# Altium PCB esp32p10displayPCB1.PcbDoc (part 3 of 3)
Units mil, origin at the board's own origin, x right, y up, seen from the top; angles counter-clockwise.
Board outline 3760 x 6044 mil, 2 copper layers (Top Layer, Bottom Layer); 134 components, 104 nets, 470 pads, 215 vias.
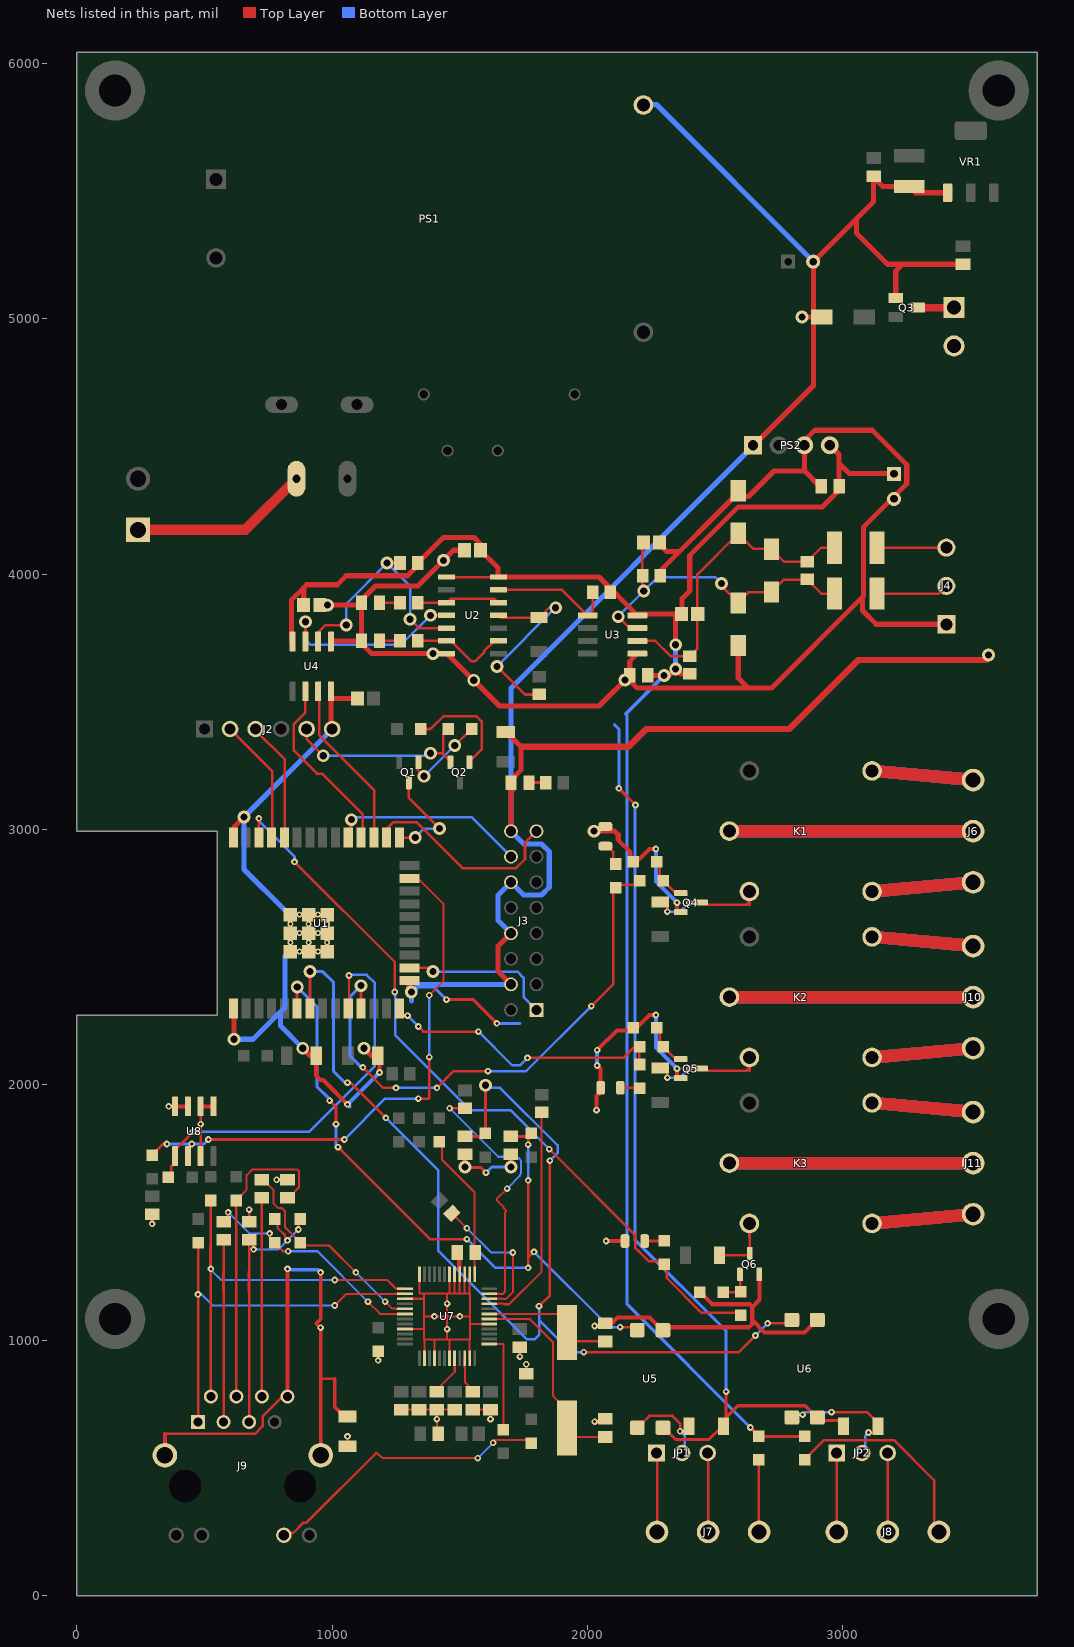
[diagram p2: the nets of this part, all layers, seen from the top]

## Via types
v1: diameter 26, hole 12, Top Layer to Bottom Layer, tented both sides, 166 vias
v2: diameter 50, hole 28, Top Layer to Bottom Layer, tented both sides, 49 vias

## Nets (pads, with @x,y where several pads share a name; then routed paths per layer and width w, separated by ;. In a path a pad name is that pad's centre, name@x,y a point inside that pad or via, vN(x,y) a via of type N, cw(c..) or ccw(c..) an arc to the next point about the centre after c; other vN are vias at no path point) (continued)
ETH_LED_Y: J9.11 R30.2 | length 1113
  Top Layer w8: 1172.5,559 1197.5,539 v1(1570,539) ; v1(1630,599) 1640,609 R30.2@1770,609
  Top Layer w10: J9.11@822.5,246.5 847.5,246.5 887.5,286.5 900,286.5 1172.5,559
  Bottom Layer w8: v1(1570,539) v1(1630,599)
ETH_LINK: R29.1 U7.25 | length 390.9
  Top Layer w8: U7.25@1614.57,985.73 1650.28,985.73 1670,985.73 R29.1@1670,650.26
ETH_MISO: R40.2 U7.34 | length 562.9
  Top Layer w7: 1662.5,1164 1665,1161.5 1680,1161.5
  Top Layer w7.5: 1650,1164 1662.5,1164
  Top Layer w8: R40.2@1468.89,1497.61 v1(1527.5,1439) ; U7.34@1614.57,1162.9 1650.28,1162.9 ; 1680,1161.5 1707.5,1189 v1(1707.5,1344)
  Bottom Layer w8: v1(1527.5,1439) 1622.5,1344 v1(1707.5,1344)
ETH_MOSI: R41.2 U7.35 | length 1056.1
  Top Layer w7: 1650,1181.5 1667.5,1181.5
  Top Layer w8: v1(1460,1909) R41.2@1520,1909 ; U7.35@1614.57,1182.58 1650.28,1182.58 ; 1667.5,1181.5 1677.5,1191.5 1677.5,1501.5 ; 1680,1504 1680,1509 1670,1519 1670,1524 1645,1549 1645,1554 v1(1685,1594)
  Bottom Layer w8: v1(1460,1909) 1650,1719 1720,1719 1725,1714 1730,1714 1740,1704 1740,1654 1735,1649 1735,1644 v1(1685,1594)
ETH_RCT: C29.1 J9.5 R26.2 R27.2 | length 1226.6
  Top Layer w8: 672.5,1191.5 672.5,1269 ; 675,1309 C29.1@675,1384 ; C29.1@690,1384 690,1359 v1(692.5,1356.5) ; R26.2@785,1464 785,1441.5 805,1421.5 807.5,1421.5 807.5,1419 810,1419 810,1416.5 812.5,1416.5 812.5,1414 815,1414 815,1401.5 v1(825,1391.5) ; v1(867.5,1434) R27.2@867.5,1464
  Top Layer w10: J9.5@674.8,680 674.8,1180 C29.1@674.8,1393.57
  Bottom Layer w8: v1(692.5,1356.5) 790,1356.5 v1(825,1391.5) v1(867.5,1434)
ETH_RDN: C31.1 J9.6 | length 931.1
  Top Layer w8: 722.5,1291.5 722.5,1369 ; 725,1474 C31.1@725,1549
  Top Layer w10: J9.6@724.8,780 724.8,1280 C31.1@724.8,1558.57
ETH_RDP: C30.1 J9.3 | length 866.1
  Top Layer w8: 572.5,1191.5 572.5,1269 ; 575,1309 C30.1@575,1384
  Top Layer w10: J9.3@574.8,680 574.8,1180 C30.1@574.8,1393.57
ETH_RST: C35.1 R22.1 U7.37 | length 561
  Top Layer w8: R22.1@1430,1766.5 1430,1706.5 1557.5,1579 1557.5,1294 ; U7.37@1558.27,1258.57 1558.27,1294.28
ETH_RXN: C31.2 R27.1 U7.5 | length 788.8
  Top Layer w8: C31.2@740,1619 770,1589 770,1536.5 787.5,1519 802.5,1519 815,1506.5 815,1444 R27.1@865,1394 ; R27.1@885,1371.5 987.5,1371.5 v1(1092.5,1266.5) ; v1(1207.5,1151.5) 1235,1124 1250,1124 ; 1249.72,1123.53 U7.5@1285.43,1123.53
  Bottom Layer w8: v1(1092.5,1266.5) v1(1207.5,1151.5)
ETH_RXP: C30.2 R26.1 U7.6 | length 865.9
  Top Layer w8: C30.2@590,1474 590,1499 v1(592.5,1501.5) ; v1(755,1419) 755,1404 R26.1@765,1394 ; R26.1@785,1371.5 807.5,1349 v1(827.5,1349) ; v1(1140,1151.5) 1187.5,1104 1250,1104 ; 1249.72,1103.84 U7.6@1285.43,1103.84
  Bottom Layer w8: v1(592.5,1501.5) 675,1419 v1(755,1419) ; v1(827.5,1349) 942.5,1349 v1(1140,1151.5)
ETH_SCLK: R39.2 U7.33 | length 884.2
  Top Layer w7: 1650,1144 1670,1144 1672.5,1141.5
  Top Layer w8: U7.33@1614.57,1143.21 1650.28,1143.21 ; 1672.5,1141.5 1692.5,1141.5 1820,1269 R39.2@1820,1893.65
ETH_TCT: C28.1 J9.4 R28.1 | length 1340
  Top Layer w8: 622.5,1291.5 622.5,1369 ; 625,1464 R28.1@625,1536.5 ; R28.1@635,1559 665,1589 665,1646.5 687.5,1669 862.5,1669 870,1661.5 870,1599 C28.1@840,1569
  Top Layer w10: J9.4@624.8,780 624.8,1280 R28.1@624.8,1547.74
ETH_TXN: J9.2 R25.1 U7.1 | length 1698.9
  Top Layer w8: v1@522.5,1291.5 522.5,1369 ; 525,1464 R25.1@525,1536.5 ; v1(1010,1236.5) 1215,1236.5 1250,1201.5 ; 1249.72,1202.27 U7.1@1285.43,1202.27
  Top Layer w10: J9.2@524.8,780 v1(524.8,1280) R25.1@524.8,1547.74
  Bottom Layer w8: 532.5,1269 565,1236.5 v1(1010,1236.5)
ETH_TXP: J9.1 R24.1 U7.2 | length 1688.2
  Top Layer w7.5: 1055,1181.5 1250,1181.5
  Top Layer w8: v1@475,1191.5 475,1269 ; 475,1299 R24.1@475,1371.5 ; v1(1010,1136.5) 1055,1181.5 ; 1249.72,1182.58 U7.2@1285.43,1182.58
  Top Layer w10: J9.1@474.8,680 v1(474.8,1180) R24.1@474.8,1382.74
  Bottom Layer w8: v1@487.5,1181.5 532.5,1136.5 v1(1010,1136.5)
ETH_XI: C32.1 U7.30 Y1.2 | length 669.6
  Top Layer w8: U7.30@1614.57,1084.16 1650.28,1084.16 ; 1650,1084 1772.5,1084 1865,991.5 1865,781.5 Y1.2@1902.5,744 ; Y1.2@1937.5,621.5 C32.1@2055,621.5
ETH_XO: C33.1 U7.31 Y1.1 | length 405.7
  Top Layer w8: U7.31@1614.57,1103.84 1650.28,1103.84 ; 1650,1104 Y1.1@1902.5,1104 ; Y1.1@1937.5,996.5 C33.1@2055,996.5
GND: C3.N C4.1 C5.1 C6.2 C7.2 C8.2 C9.2 C14.1 C17.2 C18.2 C19.2 C20.2 C21.2 C22.2 C23.2 C24.2 C25.2 C26.2 C27.2 C28.2 C29.2 C32.2 C33.2 C34.1 C35.2 C36.2 D7.A D8.C D10.C D14.C D16.C J2.6 J3.04 J3.08 J3.12 J3.16 J5.2 PS1.3 PS2.1 Q3.1 Q4.2 Q5.2 Q6.2 R14.1 R23.1 R32.1 R35.1 U1.1 U1.15 U1.38 U1.39_1 U1.39_2 U1.39_3 U1.39_4 U1.39_5 U1.39_6 U1.39_7 U1.39_8 U1.39_9 U1.39_10 U1.39_11 U1.39_12 U1.39_13 U1.39_14 U1.39_15 U1.39_16 U1.39_17 U1.39_18 U1.39_19 U1.39_20 U1.39_21 U4.4 U5.3 U6.3 U7.3 U7.9 U7.14 U7.16 U7.19 U7.23 U7.29 U7.38 U7.39 U7.40 U7.41 U7.42 U7.48 U8.1 U8.2 U8.3 U8.4 U8.7 VR1.1 | length 18004.7
  Top Layer w8: v1(782.5,1629) C28.2@810,1629 ; C34.1@1060,596.5 v1(1060,624) ; v1(1180,921.5) R23.1@1180,946.5 ; C19.2@1285,729 C20.2@1325,729 ; U7.9@1285.43,1044.79 1360,1044.79 ; U7.3@1285.43,1162.9 1360,1162.9 ; U7.48@1341.73,1258.57 1341.73,1184 1360,1184 ; C20.2@1355,729 C26.2@1395,729 ; 1360,1094 1540,1094 ; U7.14@1361.42,929.43 1361.42,1004 ; U7.16@1400.79,929.43 1400.79,1004 ; C23.2@1410,649 v1(1410,691.5) C26.2@1410,719 ; C26.2@1425,729 C21.2@1465,729 ; 1450,1004 1450,1184 ; U7.19@1459.84,929.43 1459.84,1004 ; 1459.84,1184 U7.42@1459.84,1258.57 ; 1479.53,1184 U7.41@1479.53,1258.57 ; 1499.21,1184 U7.40@1499.21,1258.57 ; 1518.9,1184 U7.39@1518.9,1258.57 ; U7.23@1538.58,929.43 1538.58,1004 ; 1538.58,1184 U7.38@1538.58,1258.57 ; 1540,1064.47 U7.29@1614.57,1064.47 ; C27.2@1565,729 C22.2@1605,729 ; v1(1620,691.5) C22.2@1620,719 ; v1(1735,936.5) C24.2@1735,964 ; C25.2@1760,879 v1(1760,906.5) ; 1360,1184 1360,1004 1540,1004 1540,1184 1360,1184
  Top Layer w10: U8.7@485,1721.56 U8.2@485,1916.44 ; C29.2@675,1464.43 v1(675,1512)
  Top Layer w12: v1(1447.5,2334) 1552.5,2334 v1(1645,2241.5) ; v2@1525,1676.5 1582.5,1676.5 v1(1602.5,1656.5)
  Top Layer w16: v1(295,1456.5) C36.2@295,1484 ; v1(360,1916.5) U8.4@380,1916.5 ; U8.4@390,1916.5 U8.3@430,1916.5 ; U8.2@490,1916.5 U8.1@530,1916.5 ; C7.2@947.5,2091.5 937.5,2081.5 937.5,2036.5 955,2019 965,2019 v1(1060,1924) ; v1(1185,2049) C8.2@1185,2091.5 ; U7.40@1497.5,1286.5 C35.2@1497.5,1329 ; v1(2027.5,681.5) C32.2@2055,681.5 ; v1(2027.5,1056.5) C33.2@2055,1056.5 ; v1(2035,1901.5) 2035,1956.5 D14.C@2050,1971.5 ; v1(2037.5,2076.5) 2050,2064 D14.C@2050,2006.5 ; v1(2037.5,2136.5) 2115,2214 R32.1@2167.5,2214 ; v1(2072.5,1389) D16.C@2140,1389 ; C33.2@2085,1056.5 2117.5,1089 2242.5,1089 U5.3@2280,1051.5 ; 2125,2954 2167.5,2911.5 R14.1@2167.5,2884 ; R32.1@2190,2221.5 2242.5,2274 v1(2267.5,2274) ; R14.1@2190,2871.5 2242.5,2924 v1(2267.5,2924) ; U5.3@2310,1051.5 2632.5,1051.5 2645,1064 2645,1131.5 ; Q5.2@2350,2031.5 v1(2350,2064) ; Q4.2@2350,2681.5 v1(2350,2714) ; R35.1@2450,1179 2487.5,1141.5 2635,1141.5 2645,1131.5 ; 2645,1079 2692.5,1031.5 2850,1031.5 U6.3@2885,1066.5 ; Q6.2@2672.5,1239 2672.5,1159 2645,1131.5
  Top Layer w20: U1.1@612.91,2299.35 615,2299 v2(615,2179) ; U1.38@612.91,2968.65 615,2969 615,3009 v2(655,3049) ; v2(885,2144) 915,2114 940,2114 C7.2@938.07,2114 ; U4.4@995,3514 1100,3514 C14.1@1098.5,3514 ; U4.4@995,3541.56 995,3544 995,3399 J2.6@1000,3394 ; v2(1125,2144) 1155,2114 1180,2114 C8.2@1178.07,2114 ; U1.15@1302.28,2409 1300,2409 1300,2374 v2(1310,2364) ; v2(1520,1679) C18.2@1520,1719 ; C9.2@1680,3382.07 1680,3384 1740,3324 1740,3234 1700,3194 J3.16@1700,2994 ; v2(1700,1679) C17.2@1700,1719 ; J3.04@1700,2394 1650,2444 1650,2544 J3.08@1700,2594 ; 1705,3154 D8.C@1705,3169 ; v2(2025,2994) 2105.78,2994 2120,2979.78 2120,2962.4 ; PS2.1@2648.43,4505.1 2650,4504 2885,4739 C3.N@2885,5224 ; v2(2840,5007) D7.A@2916.73,5007 ; 3053.28,5392.28 3053.28,5335.72 3175,5214 3470,5214 C5.1@3470,5213.57 ; C4.1@3120,5554 3155,5519 C6.2@3260,5519 ; C4.1@3120,5559 3120,5459 C3.N@2885,5224 ; Q3.1@3206.69,5081.4 3206.7,5187.3 3233.4,5214 ; VR1.1@3410,5494 3285,5494 C6.2@3260,5519 ; C3.N@2885,5224 C3.N@2883.43,5224 C3.N@2885,5224 ; C6.2@3260,5519 C6.2@3260,5518.37 C6.2@3260,5519
  Top Layer w25: 1740,3324 2160,3324 2230,3394 2790,3394 3060,3664 3561,3664 3570,3673 v2(3570,3684)
  Bottom Layer w12: v2@1315,2366.5 1332.5,2384 1397.5,2384 v1(1447.5,2334) ; v1(1602.5,1656.5) 1625,1679 v2@1695,1679 ; v1(1645,2241.5) 1735,2241.5
  Bottom Layer w16: v1@1067.5,1916.5 v1(1060,1924) v1(1185,2049) ; v1(2037.5,2076.5) v1(2037.5,2136.5) ; v1(2267.5,2274) 2267.5,2146.5 v1(2350,2064) ; v1(2267.5,2924) 2267.5,2796.5 v1(2350,2714)
  Bottom Layer w20: v2(615,2179) 690,2179 815,2304 815,2504 ; 798.28,2287.28 798.28,2230.72 v2(885,2144) ; 815,2684 655,2844 v2(655,3049) J2.6@1000,3394 ; 1310,2329 v2(1310,2364) 1340,2394 J3.04@1700,2394 ; J3.08@1700,2594 1650,2644 1650,2744 J3.12@1700,2794 1750,2744 1820,2744 1850,2774 1850,2914 1820,2944 1750,2944 J3.16@1700,2994 1700,3554 2650,4504 PS2.1@2648.43,4505.1 ; PS1.3@2218.23,5837.43 2220,5839 2270,5839 2885,5224 C3.N@2883.43,5224
  other v1: 1450,1044 1400,1094 1500,1094 1450,1144 485,1846.5
GPIO_0: Q1.3 U1.25 | length 401.4
  Top Layer w10: U1.25@1262.91,2968.65 1265,2969 v2(1325,2969) ; Q1.3@1300,3184.04 1300,3124 v2(1420,3004)
  Bottom Layer w10: v2(1325,2969) 1360,3004 v2(1420,3004)
I2C_SCL: R38.1 U1.23 U8.6 | length 2106.8
  Top Layer w8: U1.23@1332.5,2801.5 1342.5,2801.5 1435,2709 1435,2406.5 v1(1380,2351.5) ; 1380,1946.5 v1(1380,2109)
  Top Layer w10: R38.1@305,1736.5 337.5,1769 v1(352.5,1769) ; U8.6@435,1754 v1(450,1769) ; v1(515,1786.5) v1(1047.5,1786.5) ; v1(1337.5,1946.5) 1377.5,1946.5
  Bottom Layer w8: v1(1380,2109) v1(1380,2351.5)
  Bottom Layer w10: v1(352.5,1769) v1(450,1769) 497.5,1769 v1(515,1786.5) ; v1(1047.5,1786.5) 1207.5,1946.5 v1(1337.5,1946.5)
I2C_SDA: R37.1 U1.10 U8.5 | length 1516
  Top Layer w8: U1.10@1062.91,2299.35 1066,2329 v1(1066,2429)
  Top Layer w10: R37.1@370,1649 370,1681.5 U8.5@380,1691.5 ; U8.5@390,1751.5 v1(455,1816.5)
  Bottom Layer w10: v1(455,1816.5) 910,1816.5 1167.5,2074 1167.5,2399 1135,2431.5 v1@1077.5,2431.5
IN1: C17.1 R18.1 U1.6 U5.4 | length 2823
  Top Layer w10: v1(990,1939) 1015,1914 v1(1015,1846.5) ; v1(1022.5,1756.5) 1382.5,1396.5 v1(1527.5,1396.5) ; v1(1767.5,1284) v1(1767.5,1626.5) ; 1767.5,1324 v1(1790,1346.5) ; v1(1767.5,1766.5) R18.1@1767.5,1794 ; v1(2127.5,1051.5) U5.4@2180,1051.5
  Top Layer w12: U1.6@862.91,2299.35 v2(862.9,2384) ; C17.1@1715,1799 R18.1@1770,1799
  Bottom Layer w10: v1(1015,1846.5) 1015,1764 v1(1022.5,1756.5) ; v1(1527.5,1396.5) 1640,1284 v1(1767.5,1284) ; v1(1767.5,1626.5) v1(1767.5,1766.5) ; v1(1790,1346.5) 2085,1051.5 v1(2127.5,1051.5)
  Bottom Layer w12: v2(862.9,2384) 940,2307 940,1994 v1@990,1944
IN1_COM: J7.3 R16.1 | length 250
  Top Layer w10: J7.3@2670,271.5 R16.1@2670,521.5
IN1_NC: J7.2 JP1.3 | length 272.5
  Top Layer w10: J7.2@2472.5,271.5 JP1.3@2472.5,544
IN1_NO: J7.1 JP1.1 | length 272.5
  Top Layer w10: J7.1@2272.5,271.5 JP1.1@2272.5,544
IN1_SIG: D11.C JP1.2 U5.1 | length 313.1
  Top Layer w10: U5.1@2210,671.5 2242.5,704 2332.5,704 2362.5,674 v1(2362.5,644) D11.C@2387.5,644
  Bottom Layer w10: v1(2362.5,644) 2380,626.5 JP1.2@2380,571.5
IN2: C18.1 R19.1 U1.7 U6.4 | length 4467.8
  Top Layer w10: v1(1060,2009) 1072.5,2009 v1(1210,1871.5) ; v1(1810,1134) 1852.5,1176.5 v1(1852.5,1704) ; v1(1985,954) 2592.5,954 v1(2657.5,1019) ; v1(2705,1066.5) U6.4@2785,1066.5
  Top Layer w12: U1.7@912.91,2299.35 v2(912.9,2444) ; C18.1@1535,1799 R19.1@1590,1799 ; R19.1@1600,1819 v2(1600,1999)
  Bottom Layer w10: v1@1057.5,2009 v1(1060,2009) ; v1(1210,1871.5) 1415,1666.5 1415,1351.5 1762.5,1004 1792.5,1004 1810,1021.5 v1(1810,1134) ; v2@1622.5,1989 1657.5,1989 1882.5,1764 1882.5,1734 v1(1852.5,1704) ; 1810,1079 1935,954 v1(1985,954) ; v1(2657.5,1019) v1(2705,1066.5)
  Bottom Layer w12: v2(912.9,2444) 963.56,2444 1005,2402.55 1005,2054 v1@1055,2004
IN2_COM: J8.3 R17.1 | length 779.7
  Top Layer w10: R17.1@2860,544 2925,609 3200,609 3357.5,451.5 J8.3@3357.5,261.5
IN2_NC: J8.2 JP2.3 | length 272.5
  Top Layer w10: J8.2@3175,271.5 JP2.3@3175,544
IN2_NO: J8.1 JP2.1 | length 272.5
  Top Layer w10: J8.1@2975,271.5 JP2.1@2975,544
IN2_SIG: D12.C JP2.2 U6.1 | length 433.8
  Top Layer w10: U6.1@2815,709 v1(2842.5,709) ; v1(2955,719) 3095,719 D12.C@3127.5,686.5 ; v1(3100,639) 3125,639 D12.C@3127.5,641.5
  Bottom Layer w10: v1(2842.5,709) 2852.5,719 v1(2955,719) ; JP2.2@3087.5,569 3087.5,626.5 v1(3100,639)
ISO_5V: C1.P C2.2 C10.1 C11.2 C12.2 C15.2 PS2.4 R5.2 R6.2 R11.1 R16.2 R17.2 U2.1 U2.14 U3.8 U4.8 | length 7419
  Top Layer w10: U2.1@1448,3989 U2.14@1652,3989
  Top Layer w12: v1(2637.5,659) R16.2@2660,636.5 ; R16.2@2680,624 R17.2@2840,624
  Top Layer w20: U4.8@845,3736.44 845,3734 840,3739 840,3899 855,3914 900,3959 1020,3959 1055,3994 1295,3994 1335,4034 R6.2@1335,4044 ; C15.2@888.5,3879 888.5,3947.5 ; R11.1@2089.45,3929 R11.1@2097.2,3936.8 ; U3.8@2190,3844 C11.2@2370,3844 ; U3.8@2195,3839 2045,3989 U2.14@1650,3989 ; C10.1@2235.43,3604 2235,3604 2320,3604 v2(2345,3629) 2365,3609 2400,3609 R5.2@2400,3609.55 ; v2(2345,3724) C11.2@2345,3844 ; PS2.4@2948.43,4505.1 2950,4504 2985,4469 C2.2@2985,4344 ; 2985,4434 3025,4394 3200,4394 C1.P@3200,4393.21 ; R6.2@1335,4044 1435,4144 1555,4144 1580,4119 C12.2@1580,4094 ; R6.2@1335,4044 R6.2@1334.45,4044 R6.2@1335,4044 ; C12.2@1580,4094 1650,4024 U2.14@1650,3989 ; C12.2@1580,4094 C12.2@1581.5,4094 C12.2@1580,4094 ; U2.14@1650,3989 U2.14@1652,3989 U2.14@1650,3989 ; C11.2@2370,3844 2370,3904 2400,3934 2400,4074 2590,4264 2920,4264 2985,4329 C2.2@2985,4344 ; C11.2@2370,3844 C11.2@2368.5,3844 C11.2@2370,3844 ; C2.2@2985,4344 C2.2@2985.43,4344 C2.2@2985,4344
  Bottom Layer w12: 2155,3449 2155,1141.5 v1(2637.5,659)
  Bottom Layer w15: 2150,3454 v2(2300,3604)
  Bottom Layer w20: v2(2345,3629) v2(2345,3724)
ISO_GND: C1.N C2.1 C10.2 C12.1 C13.1 C15.1 D1.C D2.C D3.2 D6.1 D11.A D12.A J4.1 PS2.3 R9.1 U2.7 U3.5 U4.5 U5.2 U6.2 | length 9674.9
  Top Layer w12: v1(2122.5,3161.5) v1(2187.5,3096.5) ; U5.2@2310,646.5 2345,611.5 2475,611.5 D11.A@2522.5,659 ; D11.A@2542.5,686.5 v1(2542.5,799) ; 2542.5,699 2587.5,744 2852.5,744 U6.2@2885,711.5 ; U6.2@2915,686.5 D12.A@2992.5,686.5
  Top Layer w20: C15.1@951.5,3879 D2.C@1100,3879 ; U4.5@995,3736.44 995,3734 1000,3739 D1.C@1115,3739 ; D1.C@1105,3739 1155,3689 U2.7@1450,3689 ; C12.1@1518.5,4094 1520,4094 1475,4094 1335,3954 1170,3954 1115,3899 D2.C@1115,3889 ; C10.2@2155,3594 2195,3554 2720,3554 3080,3914 3080,4184 3250,4354 3250,4429 3115,4564 2890,4564 2850,4524 2850,4404 ; U3.5@2195,3689 2165,3659 C10.2@2165,3604 ; C13.1@2281.5,4124 2280,4124 2280,4119 2310.25,4088.75 2359.75,4088.75 ; R9.1@2284.45,3994 2285,3994 2285,4014 2575,4304 2630,4304 2730,4404 2850,4404 ; D6.1@2590,3720.73 2590,3719 2590,3594 2630,3554 ; D3.2@2590,4304 2590,4329 D3.2@2590,4327.27 ; PS2.3@2848.43,4505.1 PS2.3@2850,4504 ; C2.1@2914.57,4344 2915,4344 2910,4344 2850,4404 ; 3076.46,3910.46 3076.46,3857.54 3130,3804 J4.1@3405,3804 ; C1.N@3195,4299 3200,4294 C1.N@3200,4294.79 ; D1.C@1115,3739 D2.C@1115,3889 ; D1.C@1115,3739 D1.C@1114.57,3739 D1.C@1115,3739 ; D2.C@1115,3889 D2.C@1114.57,3889 D2.C@1115,3889 ; U2.7@1450,3689 1655,3484 2045,3484 C10.2@2165,3604 ; U2.7@1450,3689 U2.7@1448,3689 U2.7@1450,3689 ; C10.2@2165,3604 C10.2@2164.57,3604 C10.2@2165,3604
  Bottom Layer w12: 2105,3411.5 2122.5,3394 v1(2122.5,3161.5) ; v1(2187.5,3096.5) 2185,3094 2185,1394 2542.5,1036.5 v1(2542.5,799)
  other v2: 1554.3,3584.7 2146.8,3585.8 1395,3689 982.2,3879 1435.5,4054.5
ISO_RX: U2.4 U4.7 | length 762.9
  Top Layer w10: U4.7@895,3734 U4.7@895,3736.44 v2(895,3814) ; v2(1385,3839) 1450,3839 U2.4@1448,3839
  Bottom Layer w10: v2(895,3814) 895,3744 915,3724 1270,3724 v2(1385,3839)
ISO_TX: R6.1 U2.5 U4.6 | length 943.6
  Top Layer w10: U4.6@945,3734 U4.6@945,3736.44 945,3771.95 974.05,3801 v2(1055,3801) ; v2@1210,4044 v2(1215,4044) 1265,4044 R6.1@1265.55,4044 ; v2(1305,3824) 1340,3789 1450,3789 U2.5@1448,3789
  Bottom Layer w10: v2(1055,3801) 1055,3884 v2(1215,4044) 1305,3954 v2(1305,3824)
NetC11_1: C11.1 D3.1 D4.2 F1.1 R5.1 R7.2 U3.6 | length 1246.3
  Top Layer w10: U3.6@2195,3739 2265,3739 2325,3679 R5.1@2400,3679 ; F1.1@2967.32,4104 2965,4104 2915,4104 R7.2@2860,4049 ; R5.1@2400,3679 2430,3709 C11.1@2430,3844 ; R5.1@2400,3679 R5.1@2400,3678.45 R5.1@2400,3679 ; C11.1@2430,3844 2430,3999 D3.1@2590,4159 ; C11.1@2430,3844 C11.1@2431.5,3844 C11.1@2430,3844 ; D3.1@2590,4159 2650,4099 D4.2@2720,4099 ; D3.1@2590,4159 D3.1@2590,4160.73 D3.1@2590,4159 ; D4.2@2720,4099 2770,4049 R7.2@2860,4049 ; D4.2@2720,4099 D4.2@2720,4097.27 D4.2@2720,4099 ; R7.2@2860,4049 R7.2@2860,4048.45 R7.2@2860,4049
NetC13_2: C13.2 D4.1 D6.2 F2.1 R7.1 R9.2 U3.7 | length 1317.3
  Top Layer w10: v2(2120,3834) 2165,3789 U3.7@2195,3789 ; C13.2@2218.5,4124 2220,4124 2215,4119 R9.2@2215,3994 ; v2(2220,3934) 2215,3939 R9.2@2215,3994 ; v2(2525,3964) 2525,3954 D6.2@2590,3889 ; F2.1@2967.32,3924 2965,3924 2915,3924 R7.1@2860,3979 ; R9.2@2215,3994 R9.2@2215.55,3994 R9.2@2215,3994 ; D6.2@2590,3889 2630,3929 D4.1@2720,3929 ; D6.2@2590,3889 D6.2@2590,3887.27 D6.2@2590,3889 ; D4.1@2720,3929 2770,3979 R7.1@2860,3979 ; D4.1@2720,3929 D4.1@2720,3930.73 D4.1@2720,3929 ; R7.1@2860,3979 R7.1@2860,3979.55 R7.1@2860,3979
  Bottom Layer w10: v2(2120,3834) v2(2220,3934) 2275,3989 2500,3989 v2(2525,3964)
NetC26_1: C26.1 U7.20 | length 143.5
  Top Layer w8: C26.1@1425,809 1425,821.5 1480,876.5 1480,894 ; 1479.53,893.72 U7.20@1479.53,929.43
NetC27_1: C27.1 U7.22 | length 126.9
  Top Layer w7.5: 1520,836.5 1520,894
  Top Layer w8: 1518.9,893.72 U7.22@1518.9,929.43 ; 1520,836.5 1535,821.5 C27.1@1535,809
NetD1_A: D1.A R4.2 | length 81
  Top Layer w10: D1.A@1185.43,3739 1185,3739 1265,3739 R4.2@1265.55,3739
NetD2_A: D2.A R10.2 | length 81
  Top Layer w10: D2.A@1185.43,3889 1185,3889 1265,3889 R10.2@1265.55,3889
NetD5_A: D5.A R8.1 U2.11 | length 788.3
  Top Layer w10: v2(1645,3639) 1755,3529 1810,3529 R8.1@1810,3529.55 ; U2.11@1652,3839 1650,3839 1660,3829 D5.A@1810,3829 ; v2(1875,3869) 1850,3869 D5.A@1810,3829 ; D5.A@1810,3829 D5.A@1810,3831.13 D5.A@1810,3829
  Bottom Layer w10: v2(1645,3639) v2(1875,3869)
NetD8_A: D8.A R12.2 | length 40
  Top Layer w12: D8.A@1785,3184 R12.2@1825,3184
NetD9_A: D9.A K1.COIL2 Q4.3 | length 381.6
  Top Layer w10: D9.A@2307.5,2706.5 2312.5,2701.5 v1(2312.5,2679) ; v1(2397.5,2714) Q4.3@2425,2714 ; Q4.3@2465,2714 2472.5,2706.5 2622.5,2706.5 2630,2714
  Top Layer w12: 2634,2704 K1.COIL2@2634,2757.8
  Bottom Layer w10: v1(2312.5,2679) 2362.5,2679 v1(2397.5,2714)
NetD10_A: D10.A R15.1 | length 58.7
  Top Layer w10: D10.A@2085,2929 2100,2914 R15.1@2100,2876.5
NetD13_A: D13.A K2.COIL2 Q5.3 | length 381.6
  Top Layer w10: D13.A@2307.5,2056.5 2312.5,2051.5 v1(2312.5,2029) ; v1(2397.5,2064) Q5.3@2425,2064 ; Q5.3@2465,2064 2472.5,2056.5 2622.5,2056.5 2630,2064
  Top Layer w12: 2634,2054 K2.COIL2@2634,2107.8
  Bottom Layer w10: v1(2312.5,2029) 2362.5,2029 v1(2397.5,2064)
NetD14_A: D14.A R33.1 | length 60
  Top Layer w10: D14.A@2135,1989 R33.1@2195,1989
NetD15_A: D15.A K3.COIL2 Q6.3 | length 196.3
  Top Layer w10: D15.A@2527.5,1334 Q6.3@2630,1334 ; Q6.3@2635,1359 2635,1399
  Top Layer w12: 2634,1404 K3.COIL2@2634,1457.8
NetD16_A: D16.A R36.1 | length 60
  Top Layer w10: D16.A@2230,1389 R36.1@2290,1389
NetF1_2: F1.2 J4.3 | length 272.3
  Top Layer w10: F1.2@3132.68,4104 3135,4104 J4.3@3405,4104
NetF2_2: F2.2 J4.2 | length 284.7
  Top Layer w10: F2.2@3132.68,3924 3135,3924 3375,3924 J4.2@3405,3954
NetF3_1: F3.1 J1.1 | length 702.8
  Top Layer w40: J1.1@240,4174 540,4174 660,4174 F3.1@860,4374
NetJ5_1: J5.1 Q3.3 | length 141.7
  Top Layer w30: Q3.3@3293.31,5044 J5.1@3435,5044
NetQ1_1: Q1.1 R3.2 | length 330.6
  Top Layer w10: Q1.1@1337.4,3263.96 1335,3264 1335,3234 v2(1360,3209) ; v2(1480,3329) 1545,3394 R3.2@1546.26,3394
  Bottom Layer w10: v2(1360,3209) v2(1480,3329)
NetQ2_1: Q2.1 R2.2 | length 453.4
  Top Layer w10: R2.2@1346.26,3394 1345,3394 1385,3394 1435,3444 1565,3444 1585,3424 1585,3314 1535,3264 Q2.1@1537.4,3263.96
NetQ4_1: Q4.1 R13.2 R14.2 | length 109.1
  Top Layer w10: R14.2@2282.5,2864 2282.5,2811.5 R13.2@2285,2809 ; R13.2@2307.5,2789 Q4.1@2345,2751.5
NetQ5_1: Q5.1 R31.2 R32.2 | length 109.1
  Top Layer w10: R32.2@2282.5,2214 2282.5,2161.5 R31.2@2285,2159 ; R31.2@2307.5,2139 Q5.1@2345,2101.5
NetQ6_1: Q6.1 R34.2 R35.2 | length 85
  Top Layer w10: R35.2@2542.5,1189 R34.2@2590,1189 ; R34.2@2597.5,1201.5 Q6.1@2597.5,1239
NetR4_1: R4.1 U2.6 U2.9 | length 390.8
  Top Layer w10: R4.1@1334.45,3739 1335,3739 U2.6@1450,3739 ; U2.9@1652,3739 1650,3739 1635,3739 1595,3699 1595,3694 1560,3659 1545,3659 1465,3739 U2.6@1450,3739 ; U2.6@1450,3739 U2.6@1448,3739 U2.6@1450,3739
NetR10_1: R10.1 U2.3 U2.12 | length 334
  Top Layer w10: R10.1@1334.45,3889 1335,3889 U2.3@1450,3889 ; U2.12@1652,3889 1650,3889 1635,3904 1465,3904 U2.3@1450,3889 ; U2.3@1450,3889 U2.3@1448,3889 U2.3@1450,3889
OE: J3.15 U1.26 | length 805.2
  Top Layer w10: U1.26@1212.91,2968.65 1215,2969 1215,3004 1240,3029 1330,3029 1510,2849 1720,2849 1755,2884 1755,2949 J3.15@1800,2994
R1: J3.01 U1.16 | length 610
  Top Layer w10: U1.16@1302.28,2459 1380,2459 v2(1395,2444)
  Bottom Layer w10: v2(1395,2444) 1725,2444 1750,2419 1750,2344 J3.01@1800,2294
RELAY: R13.1 R15.2 U1.11 | length 2076
  Top Layer w10: v1(1120,2069) 1200,1989 v1(1250,1989) ; v1(1410,1989) 1475,2054 v1(1610,2054) ; v1(2015,2309) 2100,2394 R15.2@2100,2761.5 ; R15.2@2120,2784 2187.5,2784 R13.1@2192.5,2789
  Top Layer w12: U1.11@1112.91,2299.35 v2(1112.9,2389)
  Bottom Layer w10: v1(1250,1989) v1(1410,1989) ; v1(1610,2054) 1760,2054 v1(2015,2309)
  Bottom Layer w12: v2(1112.9,2389) 1070,2346 1070,2114 v1@1120,2064
RELAY2: R31.1 R33.2 U1.14 | length 1084.9
  Top Layer w10: U1.14@1270,2271.5 v1(1295,2271.5) ; v1(1337.5,2229) 1357.5,2209 v1(1572.5,2209) ; v1(1765,2106.5) 2140,2106.5 R31.1@2192.5,2159 ; R33.2@2202.5,2091.5 R31.1@2202.5,2139
  Bottom Layer w10: v1(1295,2271.5) v1(1337.5,2229) ; v1(1572.5,2209) 1705,2076.5 1735,2076.5 v1(1765,2106.5)
RELAY3: R34.1 R36.2 U1.36 | length 2949.3
  Top Layer w10: U1.36@712.91,2968.65 v1(712.91,3044) ; v1(852.5,2874) 1245,2481.5 v1(1245,2364) ; v1(1850,1749) 2187.5,1411.5 2187.5,1361.5 2240,1309 R36.2@2290,1309 ; R36.2@2310,1286.5 2310,1244 2445,1109 R34.1@2590,1109
  Bottom Layer w10: v1(712.91,3044) 715,3031.5 852.5,2894 v1(852.5,2874) ; v1@1247.5,2351.5 1247.5,2194 1540,1901.5 1697.5,1901.5 v1(1850,1749)
RLY2_COM: J10.2 K2.COM | length 1910
  Top Layer w50: K2.COM@2555.04,2344 J10.2@3510,2344
  Bottom Layer w50: K2.COM@2555.04,2344 J10.2@3510,2344
RLY2_NC: J10.3 K2.NC | length 795.1
  Top Layer w50: K2.NC@3114.09,2580.22 J10.3@3510,2544
  Bottom Layer w50: K2.NC@3114.09,2580.22 J10.3@3510,2544
RLY2_NO: J10.1 K2.NO | length 795.1
  Top Layer w50: K2.NO@3114.09,2107.78 J10.1@3510,2144
  Bottom Layer w50: K2.NO@3114.09,2107.78 J10.1@3510,2144
RLY3_COM: J11.2 K3.COM | length 1910
  Top Layer w50: K3.COM@2555.04,1694 J11.2@3510,1694
  Bottom Layer w50: K3.COM@2555.04,1694 J11.2@3510,1694
RLY3_NC: J11.3 K3.NC | length 795.1
  Top Layer w50: K3.NC@3114.09,1930.22 J11.3@3510,1894
  Bottom Layer w50: K3.NC@3114.09,1930.22 J11.3@3510,1894
RLY3_NO: J11.1 K3.NO | length 795.1
  Top Layer w50: K3.NO@3114.09,1457.78 J11.1@3510,1494
  Bottom Layer w50: K3.NO@3114.09,1457.78 J11.1@3510,1494
RLY_COM: J6.2 K1.COM | length 1910
  Top Layer w50: K1.COM@2555.04,2994 J6.2@3510,2994
  Bottom Layer w50: K1.COM@2555.04,2994 J6.2@3510,2994
RLY_NC: J6.3 K1.NC | length 795.1
  Top Layer w50: K1.NC@3114.09,3230.22 J6.3@3510,3194
  Bottom Layer w50: K1.NC@3114.09,3230.22 J6.3@3510,3194
RLY_NO: J6.1 K1.NO | length 795.1
  Top Layer w50: K1.NO@3114.09,2757.78 J6.1@3510,2794
  Bottom Layer w50: K1.NO@3114.09,2757.78 J6.1@3510,2794
RO: R11.2 U2.13 U3.1 | length 492.2
  Top Layer w10: U2.13@1652,3939 1650,3939 1900,3939 2000,3839 U3.1@2000.51,3839 2020.55,3859 R11.2@2020.55,3929
RTS: J2.5 Q2.2 R3.1 | length 760.4
  Top Layer w10: J2.5@900,3394 900,3354 v2(965,3289) ; v2(1385,3299) 1435,3299 ; R3.1@1453.74,3394 1455,3394 1435,3374 1435,3294 1465,3264 Q2.2@1462.6,3263.96
  Bottom Layer w10: v2(965,3289) 1375,3289 v2(1385,3299)
RX: U1.28 U4.2 | length 723.8
  Top Layer w10: U4.2@895,3541.56 895,3544 895,3459 850,3414 850,3309 940,3219 960,3219 1120,3059 1120,2974 1115,2969 U1.28@1112.91,2968.65
RXD_URT: J2.2 U1.35 | length 495.5
  Top Layer w10: J2.2@600,3394 765,3229 765,2969 U1.35@762.91,2968.65
SGND: C34.2 J9.8 J9.15 J9.16 | length 2155.2
  Top Layer w10: 352.5,634 697.5,634 727.5,664 727.5,701.5 797.5,771.5 J9.8@815,771.5 ; 940,1061.5 v1@945,1056.5 ; 960,849 1005,849
  Top Layer w15: J9.15@345.08,550.08 345.08,634 ; J9.8@824.8,780 v1(824.8,1280) ; 937.5,1066.5 955,1084 v1(955,1266.5) ; J9.16@954.92,550.08 v1(954.92,1050.08) ; 1010,849 1010,739 C34.2@1037.5,711.5
  Bottom Layer w15: 837.5,1276.5 945,1276.5 v1(955,1266.5)
STB: J3.14 U1.29 | length 777.9
  Top Layer w10: U1.29@1062.91,2968.65 1065,2969 1065,3004 1085,3024 1085,3029 v2(1075,3039)
  Bottom Layer w10: v2(1075,3039) 1085,3049 1545,3049 J3.14@1700,2894
TX: U1.27 U4.3 | length 670.7
  Top Layer w10: U4.3@945,3541.56 945,3544 950,3539 950,3369 1165,3154 1165,2969 U1.27@1162.91,2968.65
TXD_URT: J2.3 U1.34 | length 474.8
  Top Layer w10: J2.3@700,3394 700,3389 815,3274 815,2969 U1.34@812.91,2968.65
pads on no net: J3.02 J3.03 J3.05 J3.06 J3.07 J9. J9.7 U1.5 U1.17 U1.18 U1.19 U1.20 U1.21 U1.22 U1.32 U1.33 U2.2 U7.7 U7.12 U7.13 U7.18 U7.24 U7.26 U7.43 U7.44 U7.45 U7.46 U7.47

## Polygon pours and split planes (outlines as drawn)
GND on Bottom Layer "GND_BOT_1" (solid, remove dead copper, pour order 3): 391 vertices, not listed, extent 25,25 3735,6019
ISO_GND on Bottom Layer "ISO_GND_BOT_2" (solid, remove dead copper, pour order 4): 1823.85,3402.65 1820.93,3407.93 1818.85,3425.1 1815.04,3440.09 1815,3501.39 1815.91,3505.99 1817.72,3509.01 2669.79,4361.15 2672.62,4363.25 2675.93,4364.44 2694.44,4365.22 2713.01,4368.66 2739.65,4364.98 2753.43,4364.8 2767.45,4366 2784.08,4369.31 2794.22,4372.38 2806.74,4377.39 2821.97,4385.5 2833.57,4393.47 2843.88,4402.15 2851.38,4409.64 2862.31,4422.99 2869.66,4434.29 2874.66,4443.64 2881.24,4459.58 2884.99,4472.53 2887.06,4482.93 2888.73,4500.1 2887.57,4523.84 2884.22,4540.76 2877.33,4561.15 2877.15,4564.67 2878.51,4569.15 2880.61,4571.98 2966.37,4657.74 2976.97,4669.99 2983.55,4679.61 2986.15,4681.98 2989.34,4683.48 2992.82,4684 3120.78,4683.84 3132.89,4682.63 3144.44,4680.3 3155.69,4676.86 3167.48,4671.86 3176.93,4666.75 3186.23,4660.54 3199.44,4649.24 3334.56,4514.15 3346.54,4500.23 3353.7,4489.27 3362.38,4470.93 3366.3,4458.44 3368.71,4446.31 3369.99,4429.42 3370,4354.56 3367.94,4327.31 3368.13,4319.33 3370.87,4303.63 3376.95,4288.25 3385.31,4275.38 3390.58,4269.39 3403.28,4258.8 3417.33,4251.27 3424.84,4248.59 3441.2,4244.81 3454.55,4240.69 3466.61,4235.69 3478.97,4229.17 3491.12,4221.14 3503.09,4211.32 3514.42,4199.7 3517.98,4195.28 3519.48,4192.1 3520,4188.62 3519.94,3910.43 3519.09,3907.01 3516.49,3903.12 3297.36,3684.3 3290.94,3682.23 3275.53,3683.6 3124.66,3684.14 3110.8,3685.6 3100.56,3687.7 3081.12,3693.36 3065.79,3695.18 3049.21,3693.81 3033.83,3689.27 3019.67,3681.75 3007.38,3671.68 2799.57,3464.24 2783.05,3451.96 2771.56,3445.68 2758.88,3440.53 2739.2,3435.6 2719.44,3434 2189.71,3433.57 2174.34,3430.46 2160.4,3424.68 2153.65,3420.67 2146.87,3415.64 2125.98,3395.47 2117.51,3388.45 2106.93,3381.25 2096.56,3375.68 2085.14,3370.94 2073.86,3367.56 2062.31,3365.29 2049.98,3364.12 1853.45,3364.23 1850.13,3365.42 1846.51,3368.39 1838.29,3383.66 1832.15,3392.77 1823.85,3402.65
ISO_GND on Bottom Layer "ISO_GND_BOT_3" (solid, remove dead copper, pour order 5): 720,3739.42 720.07,3901.78 721.06,3906.27 724.52,3910.82 728.58,3912.97 751.74,3920.09 776.18,3930.3 798.08,3942.01 820.15,3956.66 842.09,3974.67 930.07,4061.3 933.93,4063.86 957.08,4071.03 960.59,4071.37 992.28,4062.2 1019.74,4056.9 1047.59,4054.31 1075.55,4054.46 1103.37,4057.36 1130.76,4062.96 1157.48,4071.23 1183.25,4082.07 1208.09,4095.55 1228.49,4109.18 1249.98,4126.61 1272.39,4149.02 1287.94,4167.99 1300.79,4186.57 1313.1,4194.13 1319.37,4198.79 1330.16,4208.91 1334.35,4211.12 1466.3,4210.81 1490.72,4213.22 1516.78,4218.3 1550,4227.94 1582.93,4218.36 1609.28,4213.22 1636.01,4210.69 1669,4210.9 1673.18,4209.27 1679.44,4204.31 1687.06,4196.96 1694.3,4188.46 1703.72,4173.94 1715.23,4149.39 1724.38,4136.62 1734.95,4126.59 1741.59,4121.87 1754.55,4115.2 1761.7,4112.7 1769.62,4110.78 1784.55,4109.36 2006.78,4109.06 2022.55,4110.64 2037.56,4115.24 2051.38,4122.68 2063.48,4132.67 2073.4,4144.83 2080.53,4158.16 2090.53,4191.53 2095.2,4201.9 2100.29,4210.74 2106.9,4219.99 2114.02,4228.09 2121.9,4235.46 2133.24,4243.87 2143.1,4249.54 2158.86,4256.06 2169.84,4259.03 2183.8,4261.1 2218.3,4261.33 2221.61,4260.14 2224.44,4258.05 2227.44,4253.04 2227.72,4247.22 2226.54,4243.9 2224.44,4241.07 1615.18,3631.64 1607.27,3621.98 1601.19,3612.82 1596.2,3603.47 1591.85,3593.06 1588.54,3582.27 1584.74,3561.02 1582.14,3557.13 1577.14,3554.13 1573.66,3553.61 1429.92,3553.88 1418.76,3552.79 1401.26,3549.43 1386.28,3553.76 1362.11,3558.1 1331.68,3567.51 1316.51,3568.99 1294.67,3569.25 1290.19,3571.19 1287.55,3573.73 1279.81,3590.79 1274.54,3599.64 1268.43,3607.93 1261.53,3615.59 1253.46,3622.9 1245.17,3629.01 1236.32,3634.29 1226.99,3638.66 1207.86,3644.47 1197.08,3646.07 1084.53,3646.79 1079.26,3649.28 1063.88,3662.8 1045.5,3673.82 1033.6,3678.74 1022.92,3681.93 1011.4,3684.16 1000.3,3685.2 989.7,3685.2 970,3682.76 950,3685.21 938.56,3685.14 920,3682.76 900,3685.21 888.56,3685.14 870,3682.76 850.3,3685.2 838.86,3685.16 827.47,3684 817.08,3681.93 806.4,3678.74 794.5,3673.82 784.69,3668.52 775.2,3662.13 756.03,3644.92 751.75,3643.33 747.18,3643.45 742.99,3645.27 739.2,3649.51 731.13,3666.73 727.43,3678.38 724.55,3692.83 720,3739.42

## Other copper
Top Layer:
  rectangle net 3V3: 2740,5764 3415,6014
  rectangle net 3V3: 2740,5674 3480,5764
  rectangle net GND: 809.76,2496.2 1006.61,2693.06
Bottom Layer:
  rectangle net 3V3: 2760,5689 3400,5999
  rectangle net GND: 809.76,2496.2 1006.61,2693.06
  pour cut-out: 3770,1150.27 3676.27,1244 3543.73,1244 3450,1150.27 3450,1017.73 3543.73,924 3676.27,924 3770,1017.73
  pour cut-out: 310,1150.27 216.27,1244 83.73,1244 -10,1150.27 -10,1017.73 83.73,924 216.27,924 310,1017.73
  pour cut-out: 2699.23,692 2706.16,672.66 2707.5,659 2706.16,645.34 2699.23,626 2691.61,614.59 2681.91,604.89 2664.29,594.33 2644.36,589.34 2623.84,590.35 2610.71,594.33 2598.61,600.8 2588,609.5 2105.5,1092 2093.27,1108.5 2086.34,1127.84 2085,1141.5 2085,3102.46 2073,3112 2064.3,3122.61 2055.51,3141.18 2052.84,3154.64 2052.5,3334 2225,3334 2225,3155.54 2237,3146 2245.7,3135.39 2254.49,3116.82 2257.16,3103.36 2257.16,3089.64 2255,3078.23 2255,1422.99 2596.61,1080.91 2607.17,1063.29 2612.16,1043.36 2611.16,1022.84 2607.17,1009.71 2596.61,992.09 2586.91,982.39 2575.5,974.77 2562.82,969.51 2549.36,966.84 2535.64,966.84 2515.71,971.83 2503.61,978.3 2493,987 2225,1255.01 2225,1170.49 2687,708.5
  pour cut-out: 2740,5669 3420,5669 3420,6019 2740,6019
  pour cut-out: 3750,510 3750,1559 2130,1559 2130,510
  pour cut-out: 276.95,862.6 1023.05,862.6 1023.05,0 276.95,0
  pour cut-out: 940,1944 2080,1944 2080,2004 1005,2004 1005,2444 940,2444
  pour cut-out: 3717,3584 3745,3584 3745,5114 3717,5114
  pour cut-out: 2980,3374 3745,3374 3745,3584 2980,3584
  pour cut-out: 2042.51,3259.02 2083.38,3262.37 2099.9,3265.83 2117.06,3270.91 2145.8,3282.92 2174.76,3300.27 2204.98,3325.67 2212.95,3328.93 2721.68,3329.02 2750.12,3331.07 2774.9,3335.83 2798.44,3343.16 2821.06,3353.05 2848.44,3369.38 2879.48,3395.28 2953.77,3469.57 2967.48,3478.5 2992.52,3491.67 3018.73,3502.33 3045.86,3510.37 3069.93,3515.15 3098.07,3518.11 3126.36,3518.3 3158.26,3515.15 3185.98,3509.45 3224.68,3496.23 3431.29,3477.33 3464.68,3484.72 3493.39,3487.77 3522.27,3487.98 3555.32,3484.72 3583.6,3478.88 3607.08,3471.76 3637.76,3459.05 3659.4,3447.49 3683.53,3431.62 3709.2,3410.55 3735,3383.25 3735,1677.13 3728.26,1698.98 3722.89,1710.34 3708.94,1731.2 3700.51,1740.51 3681.11,1756.43 3658.98,1768.26 3634.97,1775.54 3622.55,1777.38 3597.45,1777.38 3585.03,1775.54 3561.02,1768.26 3538.89,1756.43 3519.49,1740.51 3503.57,1721.11 3497.11,1710.34 3491.74,1698.98 3484.46,1674.97 3482,1650 3484.46,1625.03 3491.74,1601.02 3497.11,1589.66 3503.57,1578.89 3519.49,1559.49 3528.8,1551.06 3544.85,1540 2060.01,1540 2060.01,2343.99 2071.09,2344 2057.99,2357.55 2050.11,2370.54 2044.75,2385.53 2042.59,2400.57
  pour cut-out: 0,4557.6 35.3,4596.4 61.8,4618.1 112.9,4648.2 168.8,4667.7 227.5,4676 286.6,4672.6 315.7,4666.6 361.4,4650.6 542.3,4649 581.3,4645.9 631.7,4633.2 656.7,4623 704.6,4594.3 744.4,4557.9 775.4,4516.2 788.2,4492.5 806.5,4441.8 814.6,4388.5 811.9,4332.7 806.5,4306.2 795.9,4274 806.5,4241.8 812.1,4213.4 814.7,4186.5 812.1,4134.6 806.5,4106.2 789,4057.3 760.3,4009.4 723.9,3969.6 680.5,3937.6 631.7,3914.8 579.4,3901.9 540,3899 365.2,3899 315.7,3881.4 286.6,3875.4 252.5,3872 222.9,3872.2 168.8,3880.3 136,3890.2 86.6,3913.6 58.1,3932.6 35.3,3951.6 0,3990.4

## Silkscreen, mask and mechanical layers (free items; w line width, h text height)
Top Overlay:
  text "+" at 3330,5624 h36
  text "+" at 2712,5273 h30
  text "+" at 3342,5076 h36
  text "K" at 3098,5072 h30
  text "-" at 3353,4872.01 h36
  text "5V DC IN" at 3418,4737 h40
  text "N" at 228,4497 h50
  text "+" at 3075,4395 h30
  text "A" at 3293,4092 h40
  text "L" at 228,4000 h50
  text "B" at 3293,3942 h40
  text "GND" at 3183,3792 h40
  text "RELAY 230V AC" at 3291,3350 h30
  text "DTR" at 466.68,3305 h25
  text "RX" at 579.17,3305 h25
  text "TX" at 679.17,3305 h25
  text "3V3" at 766.68,3305 h25
  text "RTS" at 866.68,3305 h25
  text "GND" at 966.68,3305 h25
  text "PWR" at 1792,3240 h25
  text "RLY" at 2124.68,3039.46 h25
  text "NC" at 2541.83,548 h22
  text "NC" at 3246.83,548 h22
  text "NO" at 2143.21,505.73 h22
  text "NO" at 2900.87,433.74 h22
  text "IN1" at 2196.87,429.74 h25
  text "IN2" at 3167.35,429.74 h25
Bottom Overlay:
  text "RELAY1" at 3462.63,3300 h25
  text "NC" at 3387.65,3188 h25
  text "COM" at 3382.65,2988 h25
  text "NO" at 3387.65,2788 h25
  text "RELAY2" at 3462.63,2650 h25
  text "NC" at 3387.65,2538 h25
  text "COM" at 3382.65,2338 h25
  text "NO" at 3387.65,2138 h25
  text "RELAY3" at 3462.63,2000 h25
  text "NC" at 3387.65,1888 h25
  text "COM" at 3382.65,1688 h25
  text "NO" at 3387.65,1488 h25
  text "NO" at 2292.65,405 h25
  text "NC" at 2492.65,405 h25
  text "COM" at 2702.65,405 h25
  text "NO" at 2996.65,405 h25
  text "NC" at 3196.65,405 h25
  text "COM" at 3406.65,405 h25
  text "IN1" at 2305.15,350 h25
  text "IN2" at 3017.48,350 h25
Mechanical 1:
  the board outline again, w5

## Text inside footprints (layer, text, board x,y; h text height)
U1: Mechanical 13 "ANTENNA" at 465.67,2397.78 h70 r90